# Altium PCB stm_steppers.PcbDoc (part 2 of 2)
Units mil, origin at the board's own origin, x right, y up, seen from the top; angles counter-clockwise.
Board outline 6000 x 4000 mil, 6 copper layers (L1, L2, L3, L4, L5, L6), stack 60.556 mil thick; 99 components, 127 nets, 625 pads, 390 vias.
Unrouted connection lines stored in the file: 29.
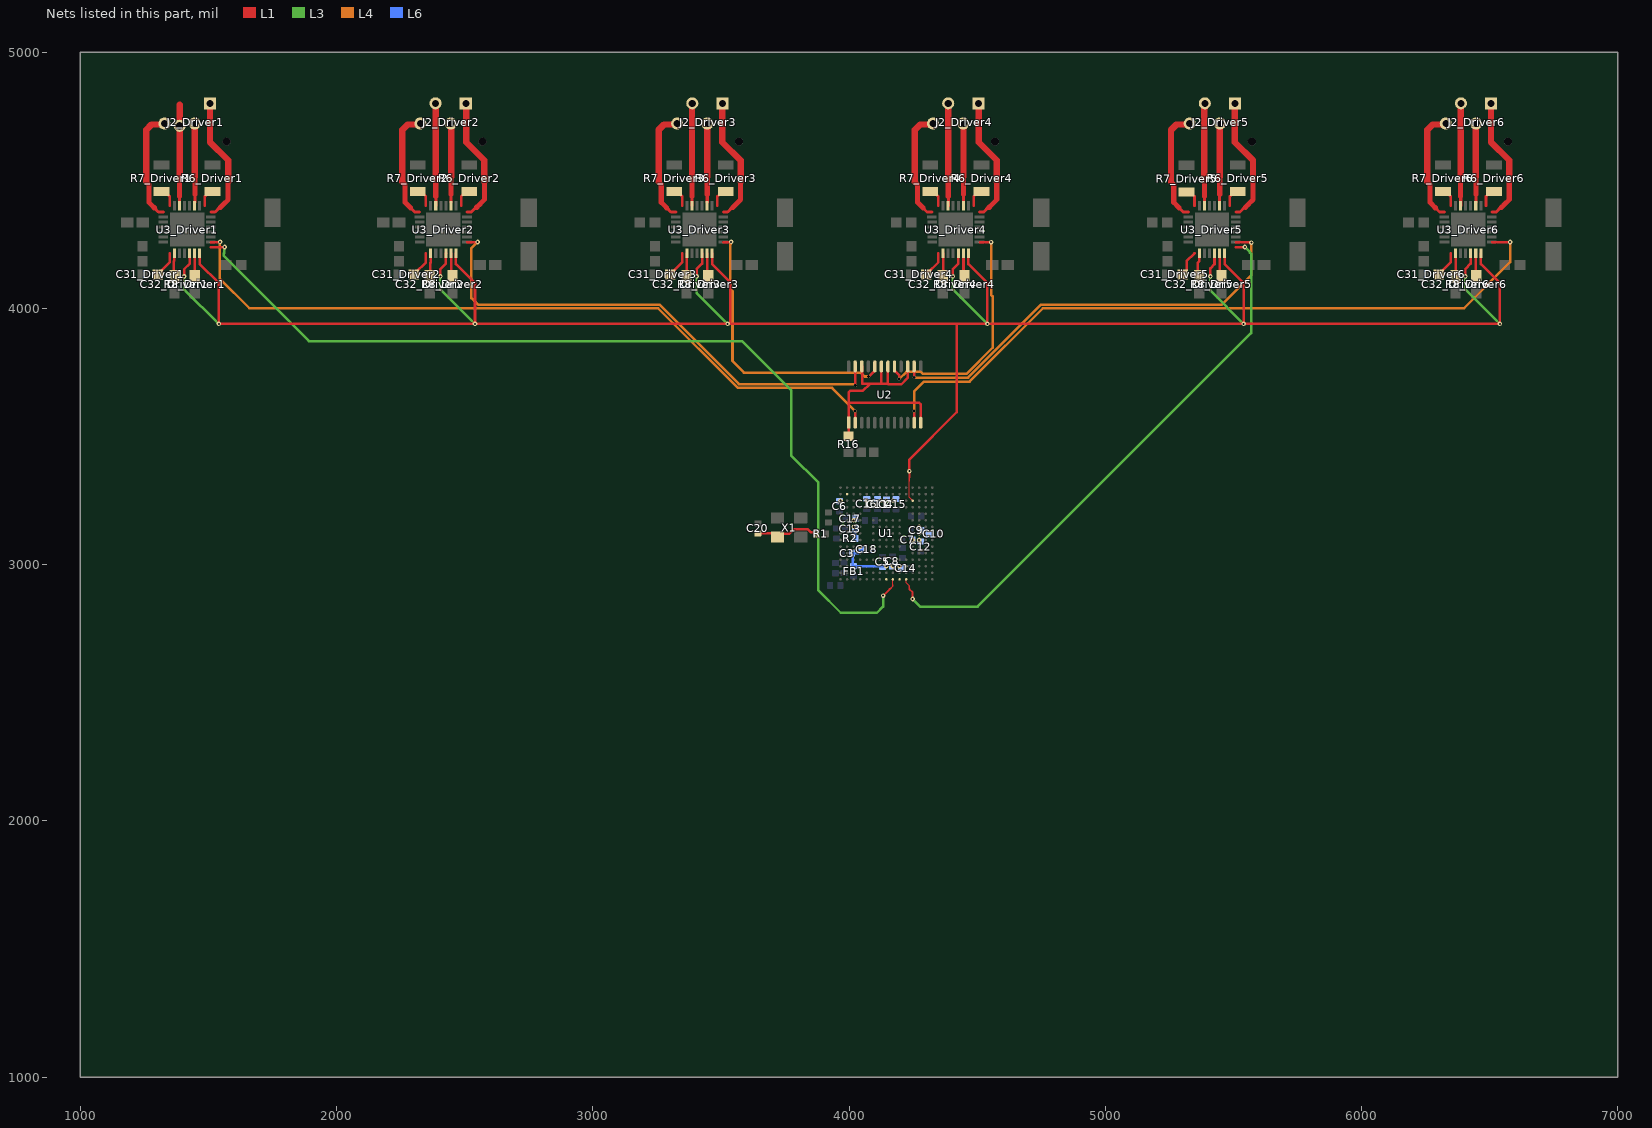
[diagram p6: the nets of this part, all layers, seen from the top]

## Via types
v1: diameter 11.81, hole 11.81, L1 to L6, 177 vias
v2: diameter 17.72, hole 7.87, L1 to L6, 141 vias
v3: diameter 19.68, hole 7.87, L1 to L6, 66 vias
v4: diameter 27.56, hole 11.81, L1 to L6, 6 vias

## Nets (pads, with @x,y where several pads share a name; then routed paths per layer and width w, separated by ;. In a path a pad name is that pad's centre, name@x,y a point inside that pad or via, vN(x,y) a via of type N, cw(c..) or ccw(c..) an arc to the next point about the centre after c; other vN are vias at no path point) (continued)
OUT1A_Driver1: J2_Driver1.2 U3_Driver1.27 | length 303.6
  L1 w12: U3_Driver1.27@1446.53,4413.22 1446.53,4444.72
  L1 w20: 1446.53,4444.72 1446.53,4514.72
  L1 w25: 1446.53,4514.72 J2_Driver1.2@1446.53,4716.86
OUT1A_Driver2: J2_Driver2.2 U3_Driver2.27 | length 303.6
  L1 w12: U3_Driver2.27@2446.53,4413.22 2446.53,4444.72
  L1 w20: 2446.53,4444.72 2446.53,4514.72
  L1 w25: 2446.53,4514.72 J2_Driver2.2@2446.53,4716.86
OUT1A_Driver3: J2_Driver3.2 U3_Driver3.27 | length 303.6
  L1 w12: U3_Driver3.27@3446.53,4413.22 3446.53,4444.72
  L1 w20: 3446.53,4444.72 3446.53,4514.72
  L1 w25: 3446.53,4514.72 J2_Driver3.2@3446.53,4716.86
OUT1A_Driver4: J2_Driver4.2 U3_Driver4.27 | length 303.6
  L1 w12: U3_Driver4.27@4446.53,4413.22 4446.53,4444.72
  L1 w20: 4446.53,4444.72 4446.53,4514.72
  L1 w25: 4446.53,4514.72 J2_Driver4.2@4446.53,4716.86
OUT1A_Driver5: J2_Driver5.2 U3_Driver5.27 | length 303.6
  L1 w12: U3_Driver5.27@5446.53,4413.22 5446.53,4444.72
  L1 w20: 5446.53,4444.72 5446.53,4514.72
  L1 w25: 5446.53,4514.72 J2_Driver5.2@5446.53,4716.86
OUT1A_Driver6: J2_Driver6.2 U3_Driver6.27 | length 303.6
  L1 w12: U3_Driver6.27@6446.53,4413.22 6446.53,4444.72
  L1 w20: 6446.53,4444.72 6446.53,4514.72
  L1 w25: 6446.53,4514.72 J2_Driver6.2@6446.53,4716.86
OUT1B_Driver1: J2_Driver1.1 U3_Driver1.24 | length 502.4
  L1 w12: 1509.51,4376.91 1525.91,4376.91 1545.6,4396.6 1557,4408
  L1 w20: 1547,4395.19 1558.4,4406.6 1576.53,4424.72 1576.53,4494.72
  L1 w25: J2_Driver1.1@1505.58,4795.6 1505.58,4649.42 1576.53,4578.47 1576.53,4494.72
OUT1B_Driver2: J2_Driver2.1 U3_Driver2.24 | length 502.4
  L1 w12: 2509.51,4376.91 2525.91,4376.91 2545.6,4396.6 2557,4408
  L1 w20: 2547,4395.19 2558.4,4406.6 2576.53,4424.72 2576.53,4494.72
  L1 w25: J2_Driver2.1@2505.58,4795.6 2505.58,4649.42 2576.53,4578.47 2576.53,4494.72
OUT1B_Driver3: J2_Driver3.1 U3_Driver3.24 | length 502.4
  L1 w12: 3509.51,4376.91 3525.91,4376.91 3545.6,4396.6 3557,4408
  L1 w20: 3547,4395.19 3558.4,4406.6 3576.53,4424.72 3576.53,4494.72
  L1 w25: J2_Driver3.1@3505.58,4795.6 3505.58,4649.42 3576.53,4578.47 3576.53,4494.72
OUT1B_Driver4: J2_Driver4.1 U3_Driver4.24 | length 502.4
  L1 w12: 4509.51,4376.91 4525.91,4376.91 4545.6,4396.6 4557,4408
  L1 w20: 4547,4395.19 4558.4,4406.6 4576.53,4424.72 4576.53,4494.72
  L1 w25: J2_Driver4.1@4505.58,4795.6 4505.58,4649.42 4576.53,4578.47 4576.53,4494.72
OUT1B_Driver5: J2_Driver5.1 U3_Driver5.24 | length 502.4
  L1 w12: 5509.51,4376.91 5525.91,4376.91 5545.6,4396.6 5557,4408
  L1 w20: 5547,4395.19 5558.4,4406.6 5576.53,4424.72 5576.53,4494.72
  L1 w25: J2_Driver5.1@5505.58,4795.6 5505.58,4649.42 5576.53,4578.47 5576.53,4494.72
OUT1B_Driver6: J2_Driver6.1 U3_Driver6.24 | length 502.4
  L1 w12: 6509.51,4376.91 6525.91,4376.91 6545.6,4396.6 6557,4408
  L1 w20: 6547,4395.19 6558.4,4406.6 6576.53,4424.72 6576.53,4494.72
  L1 w25: J2_Driver6.1@6505.58,4795.6 6505.58,4649.42 6576.53,4578.47 6576.53,4494.72
OUT2A_Driver1: J2_Driver1.3 U3_Driver1.30 | length 395.5
  L1 w10: 1387,4438 1387.47,4437.53
  L1 w12: U3_Driver1.30@1387.47,4400.52 1387.47,4437.53
  L1 w20: 1387,4438 1387,4508
  L1 w25: 1387,4508 1387,4795.13 1387.47,4795.6
OUT2A_Driver2: J2_Driver2.3 U3_Driver2.30 | length 395.5
  L1 w10: 2387,4438 2387.47,4437.53
  L1 w12: U3_Driver2.30@2387.47,4400.52 2387.47,4437.53
  L1 w20: 2387,4438 2387,4508
  L1 w25: 2387,4508 2387,4795.13 J2_Driver2.3@2387.47,4795.6
OUT2A_Driver3: J2_Driver3.3 U3_Driver3.30 | length 395.5
  L1 w10: 3387,4438 3387.47,4437.53
  L1 w12: U3_Driver3.30@3387.47,4400.52 3387.47,4437.53
  L1 w20: 3387,4438 3387,4508
  L1 w25: 3387,4508 3387,4795.13 J2_Driver3.3@3387.47,4795.6
OUT2A_Driver4: J2_Driver4.3 U3_Driver4.30 | length 395.5
  L1 w10: 4387,4438 4387.47,4437.53
  L1 w12: U3_Driver4.30@4387.47,4400.52 4387.47,4437.53
  L1 w20: 4387,4438 4387,4508
  L1 w25: 4387,4508 4387,4795.13 J2_Driver4.3@4387.47,4795.6
OUT2A_Driver5: J2_Driver5.3 U3_Driver5.30 | length 395.5
  L1 w10: 5387,4438 5387.47,4437.53
  L1 w12: U3_Driver5.30@5387.47,4400.52 5387.47,4437.53
  L1 w20: 5387,4438 5387,4508
  L1 w25: 5387,4508 5387,4795.13 J2_Driver5.3@5387.47,4795.6
OUT2A_Driver6: J2_Driver6.3 U3_Driver6.30 | length 395.5
  L1 w10: 6387,4438 6387.47,4437.53
  L1 w12: U3_Driver6.30@6387.47,4400.52 6387.47,4437.53
  L1 w20: 6387,4438 6387,4508
  L1 w25: 6387,4508 6387,4795.13 J2_Driver6.3@6387.47,4795.6
OUT2B_Driver1: J2_Driver1.4 U3_Driver1.1 | length 451.2
  L1 w12: 1288.03,4393.22 1304.34,4376.91 1324,4376.91
  L1 w20: 1256.53,4494.72 1267,4484.25 1267,4414.25 1288.03,4393.22
  L1 w25: 1256.53,4494.72 1256.53,4696.86 1277.67,4718 ; 1288.3,4718 1277.67,4718 ; J2_Driver1.4@1328.42,4716.86 1327.28,4718 1277.67,4718
OUT2B_Driver2: J2_Driver2.4 U3_Driver2.1 | length 451.2
  L1 w12: 2288.03,4393.22 2304.34,4376.91 2324,4376.91
  L1 w20: 2256.53,4494.72 2267,4484.25 2267,4414.25 2288.03,4393.22
  L1 w25: 2256.53,4494.72 2256.53,4696.86 2277.67,4718 ; 2288.29,4718 2277.67,4718 ; J2_Driver2.4@2328.42,4716.86 2327.28,4718 2277.67,4718
OUT2B_Driver3: J2_Driver3.4 U3_Driver3.1 | length 451.2
  L1 w12: 3288.03,4393.22 3304.34,4376.91 3324,4376.91
  L1 w20: 3256.53,4494.72 3267,4484.25 3267,4414.25 3288.03,4393.22
  L1 w25: 3256.53,4494.72 3256.53,4696.86 3277.67,4718 ; 3288.29,4718 3277.67,4718 ; J2_Driver3.4@3328.42,4716.86 3327.28,4718 3277.67,4718
OUT2B_Driver4: J2_Driver4.4 U3_Driver4.1 | length 451.2
  L1 w12: 4288.03,4393.22 4304.34,4376.91 4324,4376.91
  L1 w20: 4256.53,4494.72 4267,4484.25 4267,4414.25 4288.03,4393.22
  L1 w25: 4256.53,4494.72 4256.53,4696.86 4277.67,4718 ; 4288.29,4718 4277.67,4718 ; J2_Driver4.4@4328.42,4716.86 4327.28,4718 4277.67,4718
OUT2B_Driver5: J2_Driver5.4 U3_Driver5.1 | length 451.2
  L1 w12: 5288.03,4393.22 5304.34,4376.91 5324,4376.91
  L1 w20: 5256.53,4494.72 5267,4484.25 5267,4414.25 5288.03,4393.22
  L1 w25: 5256.53,4494.72 5256.53,4696.86 5277.67,4718 ; 5288.29,4718 5277.67,4718 ; J2_Driver5.4@5328.42,4716.86 5327.28,4718 5277.67,4718
OUT2B_Driver6: J2_Driver6.4 U3_Driver6.1 | length 451.2
  L1 w12: 6288.03,4393.22 6304.34,4376.91 6324,4376.91
  L1 w20: 6256.53,4494.72 6267,4484.25 6267,4414.25 6288.03,4393.22
  L1 w25: 6256.53,4494.72 6256.53,4696.86 6277.67,4718 ; 6288.29,4718 6277.67,4718 ; J2_Driver6.4@6328.42,4716.86 6327.28,4718 6277.67,4718
REF_1: U2.17 | length 2915.6
  L1 w10: 1509.52,4258.79 1510.13,4259.39 1544.39,4259.39 v2(1545,4260) ; 4023.84,3554.11 v1@4023.84,3595.3
  L4 w10: v2(1545,4260) 1543.52,4258.52 1543.52,4116.48 1659,4001 3254.6,4001 3565.6,3690 3933.84,3690 v1(4023.84,3600)
REF_2: U2.20 | length 1983.9
  L1 w10: 2509.52,4258.79 2509.89,4259.16 2549.62,4259.16 v2(2550,4259.54) ; 4023.84,3773.89 4023.89,3773.84 4023.89,3699.29 v1(4024.09,3699.09)
  L4 w10: v2(2550,4259.54) 2526.07,4235.6 2526.07,4040.86 2551.92,4015 3260.4,4015 3570.4,3705 4017.7,3705 4023.6,3699.09 v1(4024.09,3699.09)
REF_3: U2.14 | length 1093.5
  L1 w10: 3509.52,4258.79 3510.13,4259.39 3539.39,4259.39 v2(3540,4260) ; v1(4075,3734.59) 4075.35,3734.94 4078.35,3734.94 4100.61,3757.21 4100.61,3759.39
  L4 w10: v2(3540,4260) 3538.52,4258.52 3538.52,4251.59 3536.06,4249.13 3536.06,4076.57 3545,4067.63 3545,3795 3590,3750 4045,3750 4060.41,3734.59 v1(4075,3734.59)
REF_4: U2.23 | length 937.8
  L1 w10: 4177.39,3773.89 4177.39,3757.21 4195,3739.59 v1(4195,3725) ; 4509.52,4258.79 4554.45,4258.79 v2(4554.59,4258.94)
  L4 w10: v1(4195,3725) 4195.87,3725 4223.74,3752.88 4280.12,3752.88 4288.1,3744.89 4458.1,3744.89 4560,3846.79 4560,4047.35 4554.59,4052.76 v2(4554.59,4258.94)
REF_5: U2.11 | length 1712.9
  L1 w10: v1(4254.16,3730.5) 4254.16,3773.89 ; 5509.52,4258.79 5509.67,4258.94 5565.62,4258.94 5567.91,4256.64 v2(5570,4256.64)
  L4 w10: v1(4254.16,3730.5) 4254.27,3730.39 4464.11,3730.39 4748.61,4014.89 5454.89,4014.89 5570,4130 v2(5570,4256.64)
REF_6: U2.2 | length 2799.8
  L1 w10: 4254.16,3554.11 4254.16,3582.5 4254.16,3593.29 ; 6509.52,4258.79 6509.89,4259.16 6579.62,4259.16 v2(6580,4259.54)
  L4 w10: v1@4254.26,3599.89 4254.26,3676.05 4293.1,3714.89 4470.53,3714.89 4756.53,4000.89 6400.3,4000.89 6580,4180.59 v2(6580,4259.54)
  other v1: 4254.16,3600.16
ROSC_Driver1: R8_Driver1.1 U3_Driver1.14 | length 90.9
  L1 w10: U3_Driver1.14@1446.45,4215.38 1446.45,4181.78 1446.07,4181.4 1446.07,4144.36 1458,4132.42 R8_Driver1.1@1458,4129.56
ROSC_Driver2: R8_Driver2.1 U3_Driver2.14 | length 90.7
  L1 w10: U3_Driver2.14@2446.54,4215.47 2446.54,4141.02 R8_Driver2.1@2458,4129.56
ROSC_Driver3: R8_Driver3.1 U3_Driver3.14 | length 90.3
  L1 w10: U3_Driver3.14@3445.9,4214.83 3445.9,4141.66 R8_Driver3.1@3458,4129.56
ROSC_Driver4: R8_Driver4.1 U3_Driver4.14 | length 90.7
  L1 w10: U3_Driver4.14@4446.54,4215.47 4446.54,4141.02 R8_Driver4.1@4458,4129.56
ROSC_Driver5: R8_Driver5.1 U3_Driver5.14 | length 90.7
  L1 w10: U3_Driver5.14@5446.54,4215.47 5446.54,4141.02 R8_Driver5.1@5458,4129.56
ROSC_Driver6: R8_Driver6.1 U3_Driver6.14 | length 90.7
  L1 w10: U3_Driver6.14@6446.54,4215.47 6446.54,4141.02 R8_Driver6.1@6458,4129.56
SENSE1_Driver1: R6_Driver1.2 U3_Driver1.25 | length 75.7
  L1 w10: 1485.92,4400.52 1485.92,4437.55 1504.2,4455.83 R6_Driver1.2@1517,4455.83
SENSE1_Driver2: R6_Driver2.2 U3_Driver2.25 | length 75.7
  L1 w10: 2485.92,4400.52 2485.92,4437.55 2504.2,4455.83 R6_Driver2.2@2517,4455.83
SENSE1_Driver3: R6_Driver3.2 U3_Driver3.25 | length 75.7
  L1 w10: 3485.92,4400.52 3485.92,4437.55 3504.2,4455.83 R6_Driver3.2@3517,4455.83
SENSE1_Driver4: R6_Driver4.2 U3_Driver4.25 | length 75.7
  L1 w10: 4485.92,4400.52 4485.92,4437.55 4504.2,4455.83 R6_Driver4.2@4517,4455.83
SENSE1_Driver5: R6_Driver5.2 U3_Driver5.25 | length 75.7
  L1 w10: 5485.92,4400.52 5485.92,4437.55 5504.2,4455.83 R6_Driver5.2@5517,4455.83
SENSE1_Driver6: R6_Driver6.2 U3_Driver6.25 | length 75.7
  L1 w10: 6485.92,4400.52 6485.92,4437.55 6504.2,4455.83 R6_Driver6.2@6517,4455.83
SENSE2_Driver1: R7_Driver1.2 U3_Driver1.32 | length 75.7
  L1 w10: R7_Driver1.2@1317,4455.83 1329.8,4455.83 1345.17,4440.46 1348.09,4437.54 1348.09,4400.51
SENSE2_Driver2: R7_Driver2.2 U3_Driver2.32 | length 75.7
  L1 w10: R7_Driver2.2@2317,4455.83 2329.79,4455.83 2345.16,4440.46 2348.09,4437.54 2348.09,4400.51
SENSE2_Driver3: R7_Driver3.2 U3_Driver3.32 | length 75.7
  L1 w10: R7_Driver3.2@3317,4455.83 3329.79,4455.83 3345.16,4440.46 3348.09,4437.54 3348.09,4400.51
SENSE2_Driver4: R7_Driver4.2 U3_Driver4.32 | length 75.7
  L1 w10: R7_Driver4.2@4317,4455.83 4329.79,4455.83 4345.16,4440.46 4348.09,4437.54 4348.09,4400.51
SENSE2_Driver5: R7_Driver5.2 U3_Driver5.32 | length 75.7
  L1 w10: R7_Driver5.2@5317,4455.83 5329.79,4455.83 5345.16,4440.46 5348.09,4437.54 5348.09,4400.51
SENSE2_Driver6: R7_Driver6.2 U3_Driver6.32 | length 75.7
  L1 w10: R7_Driver6.2@6317,4455.83 6329.79,4455.83 6345.16,4440.46 6348.09,4437.54 6348.09,4400.51
SLEEP_RESET: U1.C12 U3_Driver1.13 U3_Driver1.15 U3_Driver2.13 U3_Driver2.15 U3_Driver3.13 U3_Driver3.15 U3_Driver4.13 U3_Driver4.15 U3_Driver5.13 U3_Driver5.15 U3_Driver6.13 U3_Driver6.15 | length 9638.5
  L1 w4: 4235.24,3326.77 4235.24,3262.8 U1.C12@4248.03,3250
  L1 w6: 4235.24,3326.77 4235.24,3339.57
  L1 w8: 4235.24,3339.57 v2(4235.24,3365.16)
  L1 w10: v2(1405,4125) 1405,4153.22 1427.12,4175.35 1427.12,4213.95 U3_Driver1.13@1426.22,4214.86 ; U3_Driver1.15@1465.59,4214.86 1465.59,4173.02 1540,4098.61 v2(1540,3940) v2(2540,3940) ; v2(2405,4125) 2405,4153.97 2426.22,4175.18 2426.22,4214.86 U3_Driver2.13@2426.84,4215.48 ; U3_Driver2.15@2465.59,4214.86 2465.59,4173.02 2540,4098.61 v2(2540,3940) ; v2(3405,4125) 3405,4153.97 3426.22,4175.18 3426.22,4214.86 U3_Driver3.13@3426.84,4215.48 ; U3_Driver3.15@3465.59,4214.86 3465.59,4173.02 3536.06,4102.54 3536.06,3943.94 3540,3940 ; v2(4235.24,3365.16) 4235.24,3410.24 4420,3595 4420,3940 ; v2(4405,4125) 4405,4153.97 4426.22,4175.18 4426.22,4214.86 U3_Driver4.13@4426.84,4215.48 ; U3_Driver4.15@4465.59,4214.86 4465.59,4173.02 4540,4098.61 v2(4540,3940) ; v2(5410,4125) 5410,4156.78 5426.22,4173 5426.22,4214.86 U3_Driver5.13@5426.84,4215.48 ; U3_Driver5.15@5465.59,4214.86 5465.59,4173.02 5540,4098.61 v2(5540,3940) ; v2(6405,4125) 6405,4153.97 6426.22,4175.18 6426.22,4214.86 U3_Driver6.13@6426.84,4215.48 ; U3_Driver6.15@6465.59,4214.86 6465.59,4173.02 6540,4098.61 v2(6540,3940) v2(5540,3940) ; v2(2540,3940) v2(3526.07,3940) 4420,3940 ; 4420,3940 v2(4540,3940) ; v2(4540,3940) v2(5540,3940)
  L3 w10: v2(1405,4125) 1405,4075 v2(1540,3940) ; v2(2405,4125) 2405,4075 v2(2540,3940) ; v2(3405,4125) 3405,4061.07 v2(3526.07,3940) ; v2(4405,4125) 4405,4075 v2(4540,3940) ; v2(5410,4125) 5410,4070 v2(5540,3940) ; v2(6405,4125) 6405,4075 v2(6540,3940)
STEP_1: U1.R9 | length 3766.5
  L1 w4: 4171.26,2921.26 U1.R9@4171.26,2942.91
  L1 w6: 4158.46,2904.53 4171.26,2917.32 4171.26,2921.26
  L1 w8: v2(4132.87,2878.94) 4158.46,2904.53
  L1 w10: 1509.52,4239.09 1561.55,4239.09 v2(1562.46,4240)
  L3 w10: v2(1562.46,4240) 1560.98,4238.52 1560.98,4216.44 1560,4215.45 1560,4205 1892,3873 3582,3873 3775,3680 3775,3425 3880,3320 3880,2900 3967.45,2812.55 4108.72,2812.55 4132.87,2836.71 v2(4132.87,2878.94)
STEP_2: U1.R8
STEP_3: U1.B2
STEP_4: U1.N11
STEP_5: U1.R11 | length 2244.6
  L1 w4: U1.R11@4222.44,2942.91 4222.44,2930.12 4235.24,2917.32
  L1 w6: 4235.24,2904.53 4235.24,2917.32
  L1 w8: 4235.24,2904.53 4248.03,2891.73 v2(4248.03,2866.14)
  L1 w10: 5509.52,4239.09 5544.09,4239.09 v2(5545,4240)
  L3 w10: v2(4248.03,2866.14) 4277.7,2836.47 4501.47,2836.47 5568.94,3903.93 5568.94,4213.64 5564.2,4218.38 5564.2,4220.8 v2(5545,4240)
STEP_6: U1.R10
VCP_Driver1: C31_Driver1.2 U3_Driver1.9 | length 92.1
  L1 w10: C31_Driver1.2@1308,4140 1348.08,4180.08 1348.08,4215.48
VCP_Driver2: C31_Driver2.2 U3_Driver2.9 | length 92.1
  L1 w10: C31_Driver2.2@2308,4140 2348.08,4180.08 2348.08,4215.48
VCP_Driver3: C31_Driver3.2 U3_Driver3.9 | length 92.1
  L1 w10: C31_Driver3.2@3308,4140 3348.08,4180.08 3348.08,4215.48
VCP_Driver4: C31_Driver4.2 U3_Driver4.9 | length 92.1
  L1 w10: C31_Driver4.2@4308,4140 4348.08,4180.08 4348.08,4215.48
VCP_Driver5: C31_Driver5.2 U3_Driver5.9 | length 93
  L1 w10: C31_Driver5.2@5308,4140 5309.51,4140 5317.2,4147.69 5317.2,4184.59 5348.08,4215.48
VCP_Driver6: C31_Driver6.2 U3_Driver6.9 | length 92.1
  L1 w10: C31_Driver6.2@6308,4140 6348.08,4180.08 6348.08,4215.48
VDD: C27_Driver1.1 C27_Driver2.1 C27_Driver3.1 C27_Driver4.1 C27_Driver5.1 C27_Driver6.1 C28_Driver1.2 C28_Driver2.2 C28_Driver3.2 C28_Driver4.2 C28_Driver5.2 C28_Driver6.2 C30_Driver1.1 C30_Driver2.1 C30_Driver3.1 C30_Driver4.1 C30_Driver5.1 C30_Driver6.1 C31_Driver1.1 C31_Driver2.1 C31_Driver3.1 C31_Driver4.1 C31_Driver5.1 C31_Driver6.1 U3_Driver1.3 U3_Driver1.16 U3_Driver1.22 U3_Driver2.3 U3_Driver2.16 U3_Driver2.22 U3_Driver3.3 U3_Driver3.16 U3_Driver3.22 U3_Driver4.3 U3_Driver4.16 U3_Driver4.22 U3_Driver5.3 U3_Driver5.16 U3_Driver5.22 U3_Driver6.3 U3_Driver6.16 U3_Driver6.22 | length 7524.6
  L1 w10: v2(1244,4337) 1244.26,4337.26 1324.22,4337.26 U3_Driver1.3@1324.48,4337.53 ; U3_Driver1.16@1485.28,4215.5 1485.28,4184.72 1507.88,4162.12 1561.52,4162.12 C27_Driver1.1@1571.4,4172 ; U3_Driver1.22@1509.52,4337.53 1591.17,4337.53 ; 1572.4,4126.4 C27_Driver1.1@1572.4,4172 ; v2(2244,4337) 2244.26,4337.26 2324.22,4337.26 U3_Driver2.3@2324.48,4337.53 ; U3_Driver2.16@2485.28,4215.5 2485.28,4182.72 2496,4172 C30_Driver4.1@2571.4,4172 ; U3_Driver2.22@2509.52,4337.53 2591.17,4337.53 ; 2572.4,4126.4 C30_Driver4.1@2572.4,4174 ; v2(3244,4337) 3244.26,4337.26 3324.22,4337.26 U3_Driver3.3@3324.48,4337.53 ; U3_Driver3.16@3485.28,4215.5 3485.28,4189.72 3502.79,4172.21 3565.65,4172.21 3565.86,4172 C30_Driver2.1@3571.4,4172 ; U3_Driver3.22@3509.52,4337.53 3591.17,4337.53 ; 3572.4,4126.4 C30_Driver2.1@3572.4,4172 ; v2(4244,4337) 4244.26,4337.26 4324.22,4337.26 U3_Driver4.3@4324.48,4337.53 ; U3_Driver4.16@4485.28,4215.5 4485.28,4205.36 4518.64,4172 C30_Driver3.1@4571.4,4172 ; U3_Driver4.22@4509.52,4337.53 4591.17,4337.53 ; C30_Driver3.1@4572.4,4172 4578.16,4166.24 4578.16,4138.62 4578.94,4137.84 4578.94,4126.4 ; v2(5244,4337) 5244.26,4337.26 5324.22,4337.26 U3_Driver5.3@5324.48,4337.53 ; U3_Driver5.16@5485.28,4215.5 5485.28,4182.72 5496,4172 C30_Driver6.1@5571.4,4172 ; U3_Driver5.22@5509.52,4337.53 5591.17,4337.53 ; 5572.4,4126.4 C30_Driver6.1@5572.4,4174 ; v2(6244,4337) 6244.26,4337.26 6324.22,4337.26 U3_Driver6.3@6324.48,4337.53 ; U3_Driver6.16@6485.28,4215.5 6485.28,4193.73 6507.01,4172 C27_Driver6.1@6571.4,4172 ; U3_Driver6.22@6509.52,4337.53 6591.17,4337.53 ; 6572.4,4126.4 C27_Driver6.1@6572.4,4172
  L3 w25: v3(1244,4131) 1243.57,4131.44 1243.57,4336.56 v2(1244,4337) 1244,4500 1301,4557 1557,4557 1610,4504 v3(1610,4355.16) ; v3(2244,4131) 2243.56,4131.44 2243.56,4336.56 v2(2244,4337) 2244,4500 2301,4557 2557,4557 2610,4504 v3(2610,4358) ; v3(3244.84,4131) 3243.56,4132.28 3243.56,4336.56 v2(3244,4337) 3244,4500 3301,4557 3557,4557 3610,4504 v3(3610,4358) ; v3(4245,4148.96) 4245,4160 4243.56,4161.44 4243.56,4336.56 v2(4244,4337) 4244,4500 4301,4557 4557,4557 4610,4504 v3(4610,4358) ; v3(5244,4131) 5243.56,4131.44 5243.56,4336.56 v2(5244,4337) 5244,4500 5301,4557 5557,4557 5610,4504 5610,4363.06 5609.56,4362.62 v3(5609.56,4358.44) ; v3(6244,4131) 6243.56,4131.44 6243.56,4336.56 v2(6244,4337) 6244,4500 6301,4557 6557,4557 6610,4504 v3(6610,4358)
  other v1: 1718,4461 1763,4461 1808,4461 2718,4461 2763,4461 2808,4461 3718,4461 3763,4461 3808,4461 4718,4461 4763,4461 4808,4461 5718,4461 5763,4461 5808,4461 6718,4461 6763,4461 6808,4461 1748,4491 1793,4491 1838,4491 2748,4491 2793,4491 2838,4491 3748,4491 3793,4491 3838,4491 4748,4491 4793,4491 4838,4491 5748,4491 5793,4491 5838,4491 6748,4491 6793,4491 6838,4491 1778,4521 1823,4521 1868,4521 2778,4521 2823,4521 2868,4521 3778,4521 3823,4521 3868,4521 4778,4521 4823,4521 4868,4521 5778,4521 5823,4521 5868,4521 6778,4521 6823,4521 6868,4521
VDD: C3.2 C4.2 C5.2 C6.2 C7.2 C8.2 C9.2 C10.2 C11.2 C12.2 C13.2 C14.2 C15.2 C16.2 C17.2 C18.2 FB1.1 R2.1 U1.C1 U1.C5 U1.C7 U1.C8 U1.C9 U1.F3 U1.G3 U1.G13 U1.H13 U1.J12 U1.J13 U1.K4 U1.N8 U1.N9 U1.N10 | length 264.9
  L6 w10: C13.2@4023.69,3140 4024.18,3139.5 4024.18,3103.5 R2.1@4024.68,3103 ; C18.2@4049.31,3060 4049.31,3058.03 4036.56,3045.28 C3.2@4011.81,3045.28 4014.76,3042.32 4014.76,2997.05 FB1.1@4017.72,2994.09 4128.22,2994.09 C5.2@4131,2991.31 ; C5.2@4131,2994.09 v2(4145.67,2994.09)
  other v2: 4171.26,2994.09 4196.85,2994.09 4043.31,3070.87 4248.03,3096.46 4273.62,3096.46 4273.62,3122.05 4017.72,3147.64 4273.62,3147.64 4017.72,3173.23 3966.54,3250 4068.9,3250 4122.97,3250 4145.67,3250 4171.26,3250
VREG_Driver1: C32_Driver1.1 U3_Driver1.10 | length 93.7
  L1 w10: C32_Driver1.1@1367,4124.6 1363.65,4127.95 1363.65,4184.22 1366.26,4186.83 1366.26,4214.57 U3_Driver1.10@1367.16,4215.48
VREG_Driver2: C32_Driver2.1 U3_Driver2.10 | length 91.7
  L1 w10: C32_Driver2.1@2367,4124.6 2366.07,4125.53 2366.07,4177.84 2367.16,4178.94 U3_Driver2.10@2367.16,4215.48
VREG_Driver3: C32_Driver3.1 U3_Driver3.10 | length 90.9
  L1 w10: C32_Driver3.1@3367,4124.6 3367.16,4124.76 U3_Driver3.10@3367.16,4215.48
VREG_Driver4: C32_Driver4.1 U3_Driver4.10 | length 90.9
  L1 w10: C32_Driver4.1@4367,4124.6 4367.16,4124.76 U3_Driver4.10@4367.16,4215.48
VREG_Driver5: C32_Driver5.1 U3_Driver5.10 | length 95.9
  L1 w10: C32_Driver5.1@5367,4124.6 5361.06,4130.53 5361.06,4178.91 5366.26,4184.1 5366.26,4214.57 U3_Driver5.10@5367.16,4215.48
VREG_Driver6: C32_Driver6.1 U3_Driver6.10 | length 90.9
  L1 w10: C32_Driver6.1@6367,4124.6 6367.16,4124.76 U3_Driver6.10@6367.16,4215.48
WIPER_A: R16.2 U2.1 U2.12 U2.15 U2.18 U2.19 U2.22 | length 1062.5
  L1 w10: R16.2@3998,3501.5 3998,3554.11 U2.1@3998.25,3554.11 3998.25,3632 ; U2.22@4049.43,3773.89 4051,3773.89 4051,3706 4081,3706 ; U2.19@4126.2,3773.89 4126.2,3706 ; U2.18@4151.8,3773.89 4151.8,3706 ; U2.15@4228.57,3773.89 4228.57,3729 4203.66,3704.09 4153.7,3704.09 4151.8,3706 ; U2.12@4279.75,3554.11 4279.75,3626.14 4273.89,3632 3998.25,3632 ; 3998.25,3632 3998.25,3672.33 4004.11,3678.19 4053.19,3678.19 4081,3706 ; 4081,3706 4126.2,3706 ; 4126.2,3706 4151.8,3706
XTAL_IN: C20.2 R1.1 X1.1 | length 268.4
  L1 w10: C20.2@3644,3122.31 3720.72,3122.31 X1.1@3720.72,3107.6 3720.72,3120.36 3765.34,3120.36 3783.23,3138.25 3839.33,3138.25 3851.11,3126.47 3863.97,3126.47 R1.1@3870.08,3120.36
pads on no net: J2_Driver1. J2_Driver2. J2_Driver3. J2_Driver4. J2_Driver5. J2_Driver6. U1.A1 U1.A2 U1.A3 U1.A4 U1.A5 U1.A6 U1.A7 U1.A8 U1.A9 U1.A10 U1.A11 U1.A12 U1.A13 U1.A14 U1.A15 U1.B4 U1.B5 U1.B6 U1.B7 U1.B8 U1.B9 U1.B10 U1.B11 U1.B13 U1.B14 U1.C2 U1.C3 U1.C4 U1.C6 U1.C10 U1.C11 U1.C13 U1.C14 U1.D1 U1.D2 U1.D3 U1.D4 U1.D10 U1.D11 U1.D12 U1.D13 U1.D14 U1.D15 U1.E1 U1.E2 U1.E3 U1.E4 U1.E12 U1.E13 U1.E14 U1.E15 U1.F1 U1.F4 U1.F14 U1.F15 U1.G4 U1.G14 U1.G15 U1.H2 U1.H3 U1.H4 U1.H14 U1.H15 U1.J2 U1.J3 U1.J4 U1.J14 U1.J15 U1.K3 U1.K12 U1.K13 U1.K14 U1.K15 U1.L1 U1.L2 U1.L3 U1.L4 U1.L12 U1.L13 U1.L14 U1.L15 U1.M2 U1.M3 U1.M4 U1.M5 U1.M6 U1.M7 U1.M11 U1.M12 U1.M13 U1.M14 U1.M15 U1.N2 U1.N3 U1.N4 U1.N5 U1.N6 U1.N7 U1.N12 U1.N13 U1.N14 U1.N15 U1.P2 U1.P5 U1.P6 U1.P7 U1.P12 U1.P13 U1.P14 U1.P15 U1.R2 U1.R4 U1.R5 U1.R6 U1.R7 U1.R12 U1.R13 U1.R14 U1.R15 U3_Driver1.2 U3_Driver1.4 U3_Driver1.21 U3_Driver1.23 U3_Driver1.26 U3_Driver1.28 U3_Driver1.29 U3_Driver1.31 U3_Driver1.33 U3_Driver2.2 U3_Driver2.4 U3_Driver2.21 U3_Driver2.23 U3_Driver2.26 U3_Driver2.28 U3_Driver2.29 U3_Driver2.31 U3_Driver2.33 U3_Driver3.2 U3_Driver3.4 U3_Driver3.21 U3_Driver3.23 U3_Driver3.26 U3_Driver3.28 U3_Driver3.29 U3_Driver3.31 U3_Driver3.33 U3_Driver4.2 U3_Driver4.4 U3_Driver4.21 U3_Driver4.23 U3_Driver4.26 U3_Driver4.28 U3_Driver4.29 U3_Driver4.31 U3_Driver4.33 U3_Driver5.2 U3_Driver5.4 U3_Driver5.21 U3_Driver5.23 U3_Driver5.26 U3_Driver5.28 U3_Driver5.29 U3_Driver5.31 U3_Driver5.33 U3_Driver6.2 U3_Driver6.4 U3_Driver6.21 U3_Driver6.23 U3_Driver6.26 U3_Driver6.28 U3_Driver6.29 U3_Driver6.31 U3_Driver6.33
copper on no net: | length 6086.7
  L1 w4: 3979.33,3322.83 3979.33,3288.39 3992.13,3275.59 ; 4196.85,2917.32 4196.85,2942.91 ; 4222.44,2994.09 4235.24,3006.89 4339.06,3006.89
  L1 w6: 3979.33,3322.83 v2(3979.33,3333.43) v2@3979.33,3339.57 ; 4196.85,2904.53 4196.85,2917.32 ; 4339.06,3006.89 4363.19,3006.89
  L1 w8: v2(4196.85,2840.55) 4196.85,2904.53 ; 4363.19,3006.89 4375.65,3019.35 v2(4376.32,3019.35)
  L1 w10: 3509.52,4239.09 3564.09,4239.09 v2(3565,4240) ; 4509.52,4239.09 4573.33,4239.09 v2(4573.53,4239.29) ; 6509.52,4239.09 6549.09,4239.09 v2(6550,4240)
  L3 w10: v2(3565,4240) 3605,4200 3605,3934.85 3835,3704.85 3835,3445 3946.57,3333.43 v2(3979.33,3333.43) ; v2(4196.85,2840.55) 4239.31,2798.09 4502.69,2798.09 5597.66,3893.07 6534.84,3893.07 6575,3933.22 6575,4220.85 6567.93,4227.92 6564.17,4227.92 6552.09,4240 v2(6550,4240) ; v2(4376.32,3019.35) 4578.94,3221.97 4578.94,4231.06 4575,4235 4575,4237.81 v2(4573.53,4239.29)
  other v3: 1373.07,4264.69 1416.38,4264.69 1459.68,4264.69 2373.07,4264.69 2416.38,4264.69 2459.68,4264.69 3373.07,4264.69 3416.38,4264.69 3459.68,4264.69 4373.07,4264.69 4416.38,4264.69 4459.68,4264.69 5373.07,4264.69 5416.38,4264.69 5459.68,4264.69 6373.07,4264.69 6416.38,4264.69 6459.68,4264.69 1373.07,4308 1416.38,4308 1459.68,4308 2373.07,4308 2416.38,4308 2459.68,4308 3373.07,4308 3416.38,4308 3459.68,4308 4373.07,4308 4416.38,4308 4459.68,4308 5373.07,4308 5416.38,4308 5459.68,4308 6373.07,4308 6416.38,4308 6459.68,4308 1373.07,4351.31 1416.38,4351.31 1459.68,4351.31 2373.07,4351.31 2416.38,4351.31 2459.68,4351.31 3373.07,4351.31 3416.38,4351.31 3459.68,4351.31 4373.07,4351.31 4416.38,4351.31 4459.68,4351.31 5373.07,4351.31 5416.38,4351.31 5459.68,4351.31 6373.07,4351.31 6416.38,4351.31 6459.68,4351.31

## Polygon pours and split planes (outlines as drawn)
VDD on L4 "NONET_L04_P007" (solid, shelved, pour order 7): 976,5000 7000,5000 7000,1000 976,1000
VDD on L3 "NONET_L03_P006" (solid, shelved, pour order 6): 976,5000 7000,5000 7000,1000 6943,1000 976,1000
GND on L5 "NONET_L05_P004" (solid, shelved, pour order 4): 976,5000 976,1000 7000,1000 7000,1137 7000,1262 7000,5000
GND on L2 "NONET_L02_P000" (solid, shelved, pour order 0): 1008,5000 976,5000 976,1000 7000,1000 7000,1011 7000,1035 7000,5000
GND on L1 "GND_L01_P249" (solid, pour order 249): 4607,4148 4607,4193 4612,4198 4657,4198 4662,4203 4662,4283 4667,4288 4707,4288 4712,4283 4712,4263 4877,4263 4882,4258 4882,4148 4877,4143 4612,4143
VDD on L1 "VDD_L01_P248" (solid, pour order 248): 4567,4129.34 4567,4066.66 4900.39,4066.66 4900.86,4067.14 4900.86,4089.66 4898,4089.66 4858.32,4129.34
VDD on L1 "VDD_L01_P260" (solid, pour order 260): 6567,4129.34 6567,4066.66 6900.39,4066.66 6900.86,4067.14 6900.86,4089.66 6898,4089.66 6858.32,4129.34
GND on L1 "GND_L01_P239" (solid, pour order 239): 2207,4658 2207,4098 2217,4088 2518,4088 2518,4019 2497,3998 2337,3998 2297,4038 2127,4038 2107,4058 2107,4658 2117,4668 2197,4668
GND on L1 "GND_L01_P263" (solid, pour order 263): 6207,4658 6207,4098 6217,4088 6518,4088 6518,4019 6497,3998 6337,3998 6297,4038 6127,4038 6107,4058 6107,4658 6117,4668 6197,4668
GND on L1 "GND_L01_P262" (solid, pour order 262): 6507,4532.45 6507,4542.45 6507,4518 6527,4518 6527,4542.45 6547.51,4542.45 6547.51,4577.88 6486.49,4577.88 6486.49,4542.45 6507,4542.45 6507,4538
GND on L1 "GND_L01_P261" (solid, pour order 261): 6607,4148 6607,4193 6612,4198 6657,4198 6662,4203 6662,4283 6667,4288 6707,4288 6712,4283 6712,4263 6877,4263 6882,4258 6882,4148 6877,4143 6612,4143
GND on L1 "GND_L01_P259" (solid, pour order 259): 6307,4532.45 6307,4542.45 6307,4518 6327,4518 6327,4542.45 6347.51,4542.45 6347.51,4577.88 6286.49,4577.88 6286.49,4542.45 6307,4542.45 6307,4538
VDD on L1 "VDD_L01_P258" (solid, pour order 258): 6558.19,4332.52 6621.52,4332.52 6633,4344 6633,4399 6643,4409 6719,4409 6719,4319 6781,4319 6781,4428 6849,4428 6898,4477 6898,4543 6753,4543 6583,4373 6583,4343
GND on L1 "GND_L01_P257" (solid, pour order 257): 5207,4658 5207,4098 5217,4088 5518,4088 5518,4019 5497,3998 5337,3998 5297,4038 5127,4038 5107,4058 5107,4658 5117,4668 5197,4668
GND on L1 "GND_L01_P256" (solid, pour order 256): 5507,4532.45 5507,4542.45 5507,4518 5527,4518 5527,4542.45 5547.51,4542.45 5547.51,4577.88 5486.49,4577.88 5486.49,4542.45 5507,4542.45 5507,4538
GND on L1 "GND_L01_P255" (solid, pour order 255): 5607,4148 5607,4193 5612,4198 5657,4198 5662,4203 5662,4283 5667,4288 5707,4288 5712,4283 5712,4263 5877,4263 5882,4258 5882,4148 5877,4143 5612,4143
VDD on L1 "VDD_L01_P254" (solid, pour order 254): 5567,4129.34 5567,4066.66 5900.39,4066.66 5900.86,4067.14 5900.86,4089.66 5898,4089.66 5858.32,4129.34
GND on L1 "GND_L01_P253" (solid, pour order 253): 5307,4532.45 5307,4542.45 5307,4518 5327,4518 5327,4542.45 5347.51,4542.45 5347.51,4577.88 5286.49,4577.88 5286.49,4542.45 5307,4542.45 5307,4538
VDD on L1 "VDD_L01_P252" (solid, pour order 252): 5558.19,4332.52 5621.52,4332.52 5633,4344 5633,4399 5643,4409 5719,4409 5719,4319 5781,4319 5781,4428 5849,4428 5898,4477 5898,4543 5753,4543 5583,4373 5583,4343
GND on L1 "GND_L01_P251" (solid, pour order 251): 4207,4658 4207,4098 4217,4088 4518,4088 4518,4019 4497,3998 4337,3998 4297,4038 4127,4038 4107,4058 4107,4658 4117,4668 4197,4668
GND on L1 "GND_L01_P250" (solid, pour order 250): 4507,4532.45 4507,4542.45 4507,4518 4527,4518 4527,4542.45 4547.51,4542.45 4547.51,4577.88 4486.49,4577.88 4486.49,4542.45 4507,4542.45 4507,4538
GND on L1 "GND_L01_P247" (solid, pour order 247): 4307,4532.45 4307,4542.45 4307,4518 4327,4518 4327,4542.45 4347.51,4542.45 4347.51,4577.88 4286.49,4577.88 4286.49,4542.45 4307,4542.45 4307,4538
VDD on L1 "VDD_L01_P246" (solid, pour order 246): 4558.19,4332.52 4621.52,4332.52 4633,4344 4633,4399 4643,4409 4719,4409 4719,4319 4781,4319 4781,4428 4849,4428 4898,4477 4898,4543 4753,4543 4583,4373 4583,4343
GND on L1 "GND_L01_P245" (solid, pour order 245): 3207,4658 3207,4098 3217,4088 3518,4088 3518,4019 3497,3998 3337,3998 3297,4038 3127,4038 3107,4058 3107,4658 3117,4668 3197,4668
GND on L1 "GND_L01_P244" (solid, pour order 244): 3507,4532.45 3507,4542.45 3507,4518 3527,4518 3527,4542.45 3547.51,4542.45 3547.51,4577.88 3486.49,4577.88 3486.49,4542.45 3507,4542.45 3507,4538
GND on L1 "GND_L01_P243" (solid, pour order 243): 3607,4148 3607,4193 3612,4198 3657,4198 3662,4203 3662,4283 3667,4288 3707,4288 3712,4283 3712,4263 3877,4263 3882,4258 3882,4148 3877,4143 3612,4143
VDD on L1 "VDD_L01_P242" (solid, pour order 242): 3567,4129.34 3567,4066.66 3900.39,4066.66 3900.86,4067.14 3900.86,4089.66 3898,4089.66 3858.32,4129.34
GND on L1 "GND_L01_P241" (solid, pour order 241): 3307,4532.45 3307,4542.45 3307,4518 3327,4518 3327,4542.45 3347.51,4542.45 3347.51,4577.88 3286.49,4577.88 3286.49,4542.45 3307,4542.45 3307,4538
VDD on L1 "VDD_L01_P240" (solid, pour order 240): 3558.19,4332.52 3621.52,4332.52 3633,4344 3633,4399 3643,4409 3719,4409 3719,4319 3781,4319 3781,4428 3849,4428 3898,4477 3898,4543 3753,4543 3583,4373 3583,4343
GND on L1 "GND_L01_P238" (solid, pour order 238): 2507,4532.45 2507,4542.45 2507,4518 2527,4518 2527,4542.45 2547.51,4542.45 2547.51,4577.88 2486.49,4577.88 2486.49,4542.45 2507,4542.45 2507,4538
GND on L1 "GND_L01_P237" (solid, pour order 237): 2607,4148 2607,4193 2612,4198 2657,4198 2662,4203 2662,4283 2667,4288 2707,4288 2712,4283 2712,4263 2877,4263 2882,4258 2882,4148 2877,4143 2612,4143
VDD on L1 "VDD_L01_P236" (solid, pour order 236): 2567,4129.34 2567,4066.66 2900.39,4066.66 2900.86,4067.14 2900.86,4089.66 2898,4089.66 2858.32,4129.34
GND on L1 "GND_L01_P235" (solid, pour order 235): 2307,4532.45 2307,4542.45 2307,4518 2327,4518 2327,4542.45 2347.51,4542.45 2347.51,4577.88 2286.49,4577.88 2286.49,4542.45 2307,4542.45 2307,4538
VDD on L1 "VDD_L01_P234" (solid, pour order 234): 2558.19,4332.52 2621.52,4332.52 2633,4344 2633,4399 2643,4409 2719,4409 2719,4319 2781,4319 2781,4428 2849,4428 2898,4477 2898,4543 2753,4543 2583,4373 2583,4343
VDD on L1 "VDD_L01_P012" (solid, pour order 12): 1558.19,4332.52 1621.52,4332.52 1633,4344 1633,4399 1643,4409 1719,4409 1719,4319 1781,4319 1781,4428 1849,4428 1898,4477 1898,4543 1753,4543 1583,4373 1583,4343
GND on L1 "GND_L01_P013" (solid, pour order 13): 1307,4532.45 1307,4542.45 1307,4518 1327,4518 1327,4542.45 1347.51,4542.45 1347.51,4577.88 1286.49,4577.88 1286.49,4542.45 1307,4542.45 1307,4538
VDD on L1 "VDD_L01_P017" (solid, pour order 17): 1567,4129.34 1567,4066.66 1900.39,4066.66 1900.86,4067.14 1900.86,4089.66 1898,4089.66 1858.33,4129.34
GND on L1 "GND_L01_P020" (solid, pour order 20): 1607,4148 1607,4193 1612,4198 1657,4198 1662,4203 1662,4283 1667,4288 1707,4288 1712,4283 1712,4263 1877,4263 1882,4258 1882,4148 1877,4143 1612,4143
GND on L1 "GND_L01_P022" (solid, pour order 22): 1507,4532.45 1507,4542.45 1507,4518 1527,4518 1527,4542.45 1547.51,4542.45 1547.51,4577.88 1486.49,4577.88 1486.49,4542.45 1507,4542.45 1507,4538
GND on L1 "GND_L01_P023" (solid, pour order 23): 1207,4658 1207,4098 1217,4088 1518,4088 1518,4019 1497,3998 1337,3998 1297,4038 1127,4038 1107,4058 1107,4658 1117,4668 1197,4668

## Other copper
L1:
  region net SENSE1_Driver4: 4479.38,4381.83 4484.18,4381.83 4491.21,4388.85 4491.21,4419.18 4491.17,4419.22 4479.38,4419.22
  region net VDD: 2479.37,4234.19 2484.17,4234.19 2491.19,4227.17 2491.19,4196.84 2491.16,4196.8 2479.37,4196.8
  region net VDD: 6479.37,4234.19 6484.17,4234.19 6491.19,4227.17 6491.19,4196.84 6491.16,4196.8 6479.37,4196.8
  region net VDD: 4479.37,4234.19 4484.17,4234.19 4491.19,4227.17 4491.19,4196.84 4491.16,4196.8 4479.37,4196.8
  region net VDD: 3479.37,4234.19 3484.17,4234.19 3491.19,4227.17 3491.19,4196.84 3491.16,4196.8 3479.37,4196.8
  region net VDD: 5479.37,4234.19 5484.17,4234.19 5491.19,4227.17 5491.19,4196.84 5491.16,4196.8 5479.37,4196.8
  region net VDD: 1479.37,4234.19 1484.17,4234.19 1491.19,4227.17 1491.19,4196.84 1491.16,4196.8 1479.37,4196.8
  region net OUT1B_Driver1: 1490.19,4370.99 1490.19,4375.8 1497.22,4382.82 1527.55,4382.82 1527.59,4382.78 1527.59,4370.99
  region net SENSE1_Driver1: 1479.38,4381.83 1484.18,4381.83 1491.21,4388.85 1491.21,4419.18 1491.17,4419.22 1479.38,4419.22
  region net OUT2B_Driver1: 1342.07,4370.99 1342.07,4375.8 1335.05,4382.82 1304.72,4382.82 1304.68,4382.78 1304.68,4370.99
  region net SENSE2_Driver1: 1353.38,4381.82 1348.46,4381.82 1341.56,4388.72 1341.56,4419.17 1341.59,4419.21 1353.38,4419.21
  region net NetU3_Driver1_17: 1490.2,4245.01 1490.2,4240.2 1497.22,4233.18 1527.56,4233.18 1527.6,4233.22 1527.6,4245.01
  region net VCP_Driver1: 1353.37,4234.17 1348.57,4234.17 1341.54,4227.15 1341.54,4196.82 1341.58,4196.78 1353.37,4196.78
  region net CP2_Driver1: 1342.56,4245.01 1342.56,4240.2 1335.54,4233.18 1305.2,4233.18 1305.16,4233.22 1305.16,4245.01
  region net OUT2B_Driver2: 2342.07,4370.99 2342.07,4375.8 2335.05,4382.82 2304.72,4382.82 2304.68,4382.78 2304.68,4370.99
  region net SENSE1_Driver2: 2479.38,4381.83 2484.18,4381.83 2491.21,4388.85 2491.21,4419.18 2491.17,4419.22 2479.38,4419.22
  region net OUT1B_Driver2: 2490.19,4370.99 2490.19,4375.8 2497.21,4382.82 2527.55,4382.82 2527.59,4382.78 2527.59,4370.99
  region net NetU3_Driver2_17: 2490.2,4245.01 2490.2,4240.2 2497.22,4233.18 2527.56,4233.18 2527.6,4233.22 2527.6,4245.01
  region net CP2_Driver2: 2342.56,4245.01 2342.56,4240.2 2335.54,4233.18 2305.2,4233.18 2305.16,4233.22 2305.16,4245.01
  region net VCP_Driver2: 2353.37,4234.17 2348.57,4234.17 2341.54,4227.15 2341.54,4196.82 2341.58,4196.78 2353.37,4196.78
  region net SENSE2_Driver2: 2353.38,4381.82 2348.46,4381.82 2341.56,4388.72 2341.56,4419.17 2341.59,4419.21 2353.38,4419.21
  region net OUT2B_Driver4: 4342.07,4370.99 4342.07,4375.8 4335.05,4382.82 4304.72,4382.82 4304.68,4382.78 4304.68,4370.99
  region net OUT1B_Driver4: 4490.19,4370.99 4490.19,4375.8 4497.21,4382.82 4527.55,4382.82 4527.59,4382.78 4527.59,4370.99
  region net NetU3_Driver4_17: 4490.2,4245.01 4490.2,4240.2 4497.22,4233.18 4527.56,4233.18 4527.6,4233.22 4527.6,4245.01
  region net CP2_Driver4: 4342.56,4245.01 4342.56,4240.2 4335.54,4233.18 4305.2,4233.18 4305.16,4233.22 4305.16,4245.01
  region net VCP_Driver4: 4353.37,4234.17 4348.57,4234.17 4341.54,4227.15 4341.54,4196.82 4341.58,4196.78 4353.37,4196.78
  region net SENSE2_Driver4: 4353.38,4381.82 4348.46,4381.82 4341.56,4388.72 4341.56,4419.17 4341.59,4419.21 4353.38,4419.21
  region net OUT2B_Driver5: 5342.07,4370.99 5342.07,4375.8 5335.05,4382.82 5304.72,4382.82 5304.68,4382.78 5304.68,4370.99
  region net SENSE1_Driver5: 5479.38,4381.83 5484.18,4381.83 5491.21,4388.85 5491.21,4419.18 5491.17,4419.22 5479.38,4419.22
  region net OUT1B_Driver5: 5490.19,4370.99 5490.19,4375.8 5497.21,4382.82 5527.55,4382.82 5527.59,4382.78 5527.59,4370.99
  region net NetU3_Driver5_17: 5490.2,4245.01 5490.2,4240.2 5497.22,4233.18 5527.56,4233.18 5527.6,4233.22 5527.6,4245.01
  region net CP2_Driver5: 5342.56,4245.01 5342.56,4240.2 5335.54,4233.18 5305.2,4233.18 5305.16,4233.22 5305.16,4245.01
  region net VCP_Driver5: 5353.37,4234.17 5348.57,4234.17 5341.54,4227.15 5341.54,4196.82 5341.58,4196.78 5353.37,4196.78
  region net SENSE2_Driver5: 5353.38,4381.82 5348.46,4381.82 5341.56,4388.72 5341.56,4419.17 5341.59,4419.21 5353.38,4419.21
  region net OUT2B_Driver3: 3342.07,4370.99 3342.07,4375.8 3335.05,4382.82 3304.72,4382.82 3304.68,4382.78 3304.68,4370.99
  region net SENSE1_Driver3: 3479.38,4381.83 3484.18,4381.83 3491.21,4388.85 3491.21,4419.18 3491.17,4419.22 3479.38,4419.22
  region net OUT1B_Driver3: 3490.19,4370.99 3490.19,4375.8 3497.21,4382.82 3527.55,4382.82 3527.59,4382.78 3527.59,4370.99
  region net NetU3_Driver3_17: 3490.2,4245.01 3490.2,4240.2 3497.22,4233.18 3527.56,4233.18 3527.6,4233.22 3527.6,4245.01
  region net CP2_Driver3: 3342.56,4245.01 3342.56,4240.2 3335.54,4233.18 3305.2,4233.18 3305.16,4233.22 3305.16,4245.01
  region net VCP_Driver3: 3353.37,4234.17 3348.57,4234.17 3341.54,4227.15 3341.54,4196.82 3341.58,4196.78 3353.37,4196.78
  region net SENSE2_Driver3: 3353.38,4381.82 3348.46,4381.82 3341.56,4388.72 3341.56,4419.17 3341.59,4419.21 3353.38,4419.21
  region net OUT2B_Driver6: 6342.07,4370.99 6342.07,4375.8 6335.05,4382.82 6304.72,4382.82 6304.68,4382.78 6304.68,4370.99
  region net SENSE1_Driver6: 6479.38,4381.83 6484.18,4381.83 6491.21,4388.85 6491.21,4419.18 6491.17,4419.22 6479.38,4419.22
  region net OUT1B_Driver6: 6490.19,4370.99 6490.19,4375.8 6497.21,4382.82 6527.55,4382.82 6527.59,4382.78 6527.59,4370.99
  region net NetU3_Driver6_17: 6490.2,4245.01 6490.2,4240.2 6497.22,4233.18 6527.56,4233.18 6527.6,4233.22 6527.6,4245.01
  region net CP2_Driver6: 6342.56,4245.01 6342.56,4240.2 6335.54,4233.18 6305.2,4233.18 6305.16,4233.22 6305.16,4245.01
  region net VCP_Driver6: 6353.37,4234.17 6348.57,4234.17 6341.54,4227.15 6341.54,4196.82 6341.58,4196.78 6353.37,4196.78
  region net SENSE2_Driver6: 6353.38,4381.82 6348.46,4381.82 6341.56,4388.72 6341.56,4419.17 6341.59,4419.21 6353.38,4419.21